# Altium PCB Baseboard-v2.0.PcbDoc (part 7 of 7)
Units mil, origin at the board's own origin, x right, y up, seen from the top; angles counter-clockwise.
Board outline 4488.19 x 3937 mil, 4 copper layers (Top Layer, Ground, Power + Signal, Bottom Layer), stack 61.81 mil thick; 219 components, 194 nets, 891 pads, 449 vias.
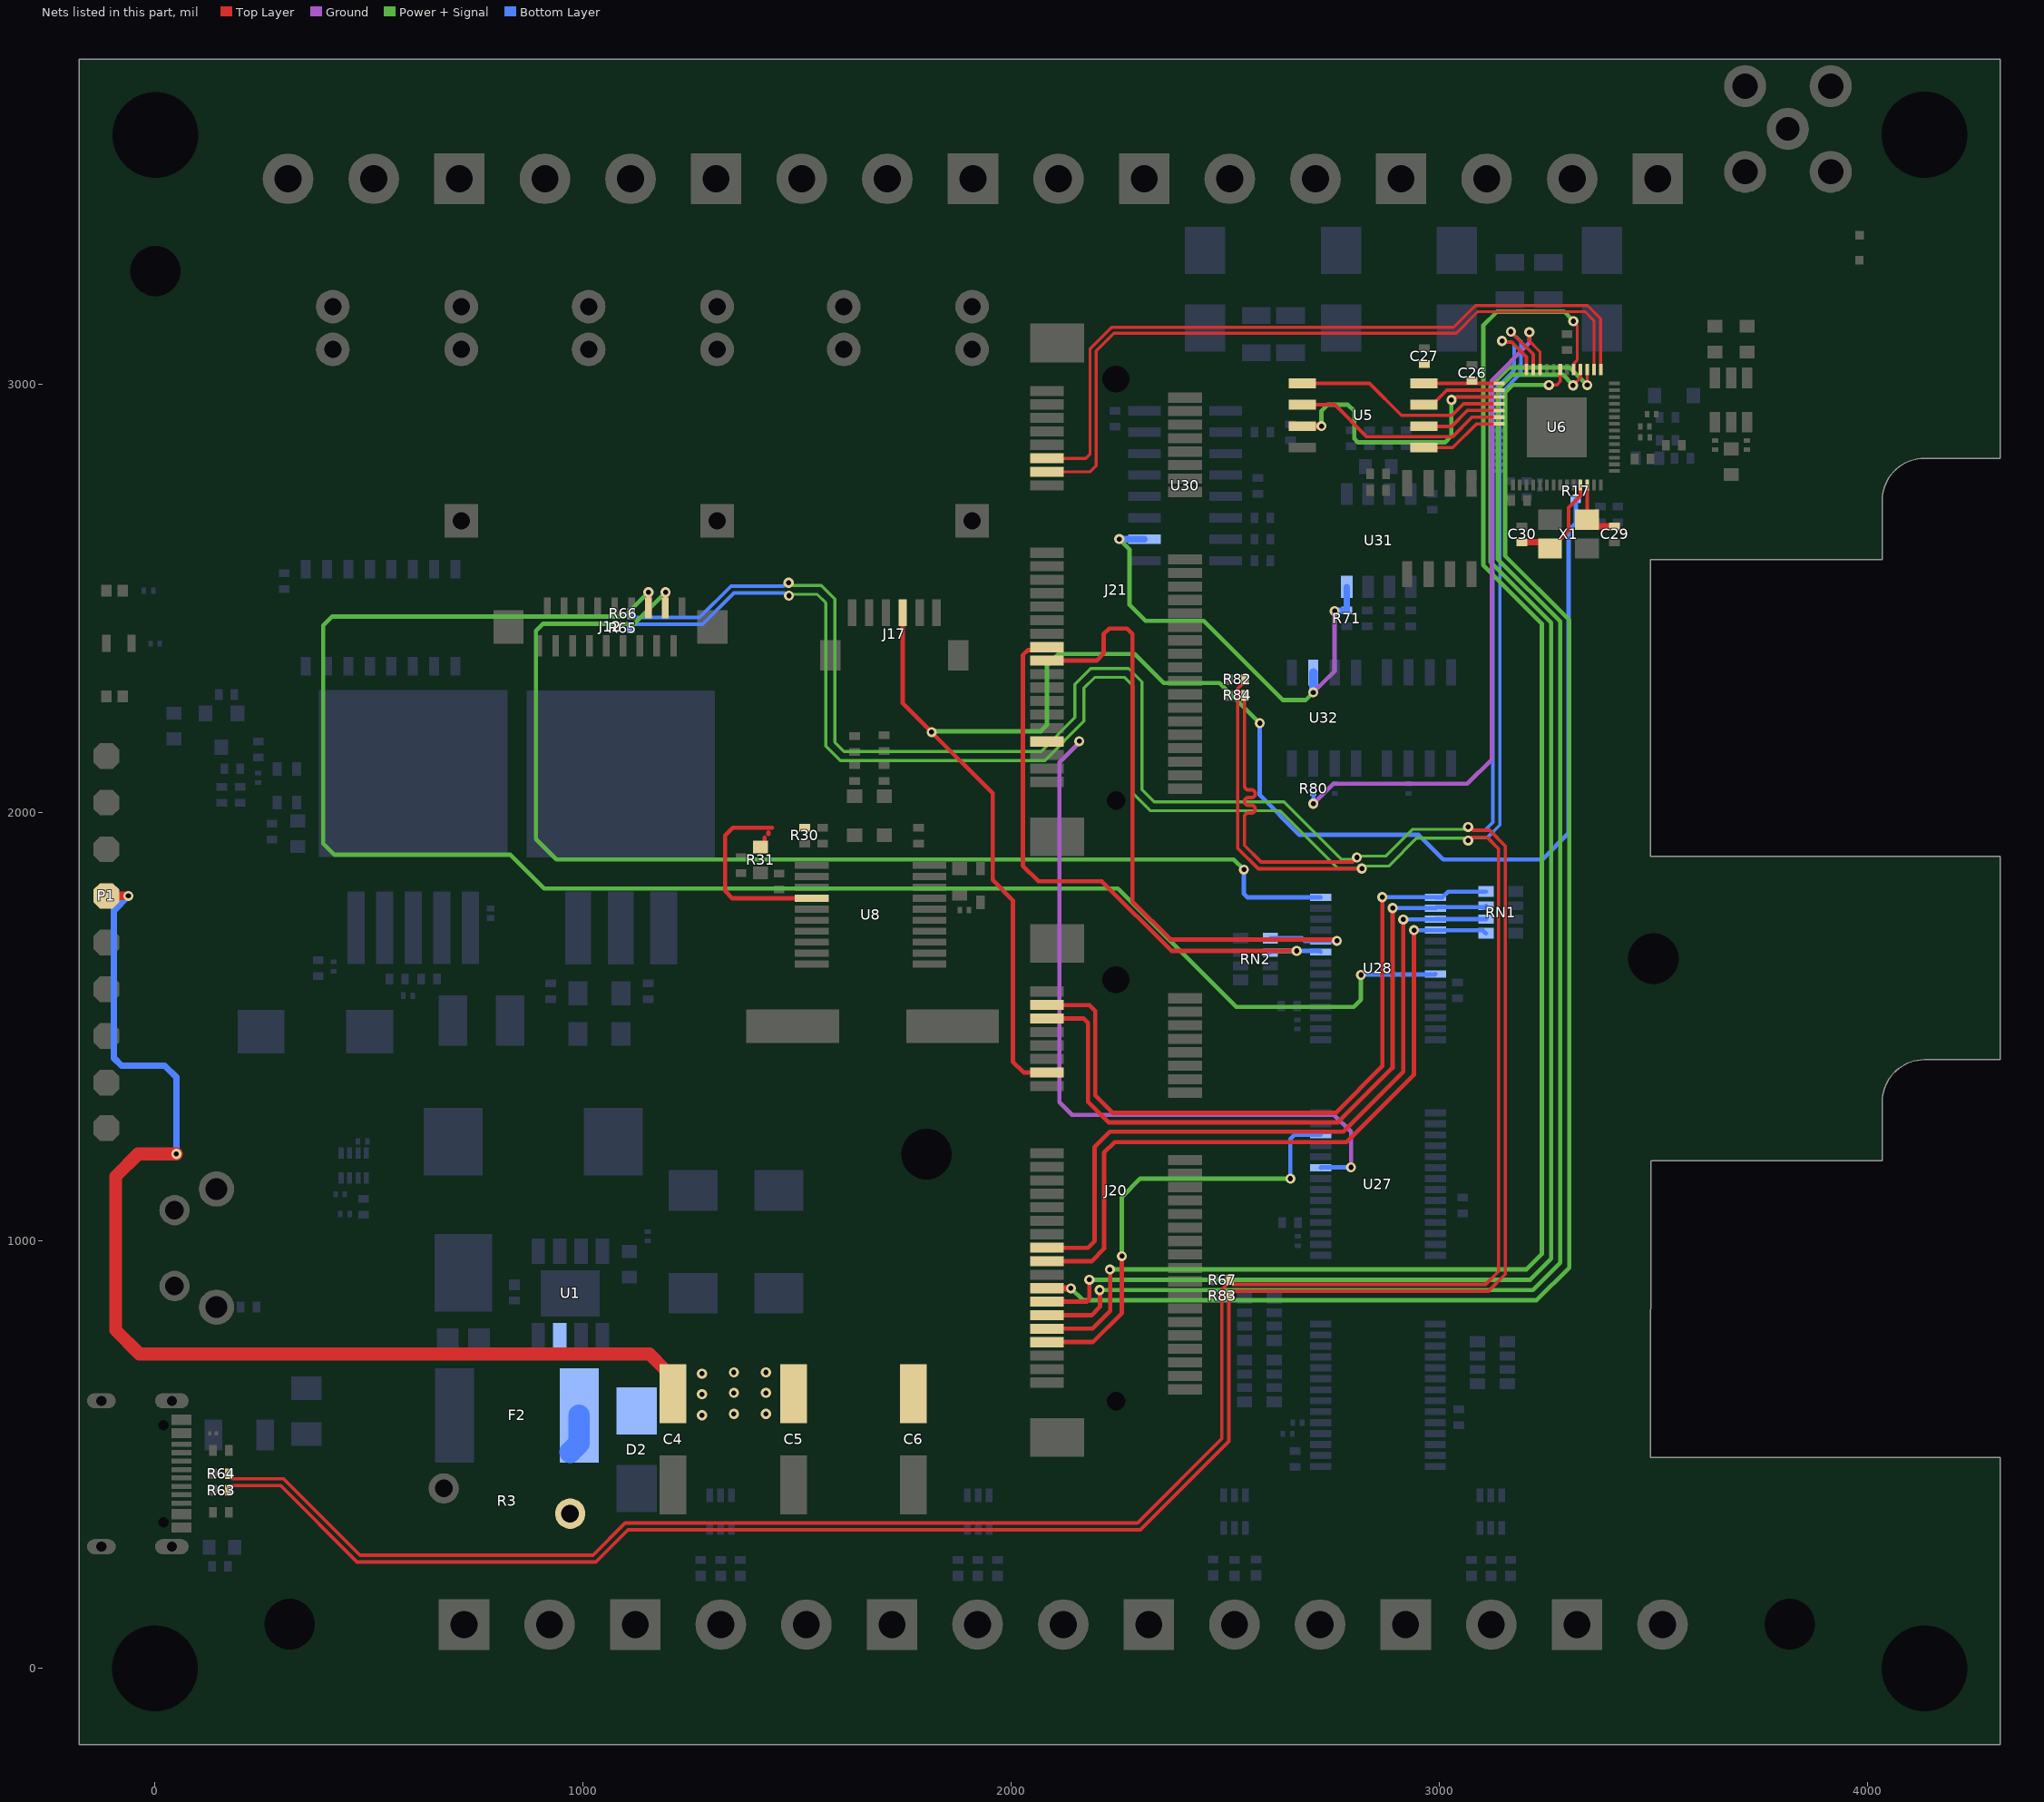
[diagram p6: the nets of this part, all layers, seen from the top]

## Via types
v1: diameter 23.62, hole 11.81, Top Layer to Bottom Layer, 449 vias

## Nets (pads, with @x,y where several pads share a name; then routed paths per layer and width w, separated by ;. In a path a pad name is that pad's centre, name@x,y a point inside that pad or via, vN(x,y) a via of type N, cw(c..) or ccw(c..) an arc to the next point about the centre after c; other vN are vias at no path point) (continued)
SLOTA_TYPE2: J21.31 RN2.2 U28.23 | length 1397.9
  Top Layer w10: J21.31@2083.72,2385.72 2076.91,2378.91 2039.59,2378.91 2027.74,2367.06 2027.74,1875.09 2063.83,1839 2211.96,1839 2374.8,1676.16 v1(2667.4,1676.16)
  Bottom Layer w10: RN2.2@2606.09,1672.57 2609.67,1676.16 2720.92,1676.16 U28.23@2723.67,1673.41
SLOTA_TYPE3: J21.33 RN2.1 U28.24 | length 1560.5
  Top Layer w10: J21.33@2083.72,2354.22 2199.78,2354.22 2216.2,2370.64 2216.2,2415.96 2229.27,2429.02 2270.9,2429.02 2283.76,2416.17 2283.76,1791.24 2372.35,1702.65 v1@2761.4,1702.65
  Bottom Layer w10: RN2.1@2606.09,1705.65 2679.67,1705.65 2686.32,1699 U28.24@2723.67,1699 2723.96,1699.29 2761.11,1699.29 v1(2761.4,1699.57)
SLOTA_UART_RX: J21.11 U6.15 | length 1717.3
  Top Layer w7: J21.11@2083.72,2826.66 2174.69,2826.66 2184.65,2836.61 2184.65,3083.11 2234.45,3132.91 2276.09,3132.91 3034.27,3132.91 3084.67,3183.31 3347.13,3183.31 3377.59,3152.85 U6.15@3377.59,3034.13
SLOTA_UART_TX: J21.13 U6.16 | length 1713
  Top Layer w7: J21.13@2083.72,2795.17 2184.06,2795.17 2198.65,2809.75 2198.65,3077.31 2240.25,3118.91 3040.07,3118.91 3090.47,3169.31 3341.33,3169.31 3361.84,3148.8 U6.16@3361.84,3034.13
SLOTB_CS: J20.37 U6.21 | length 3539
  Top Layer w7: v1(3256.57,2997.73) 3257.1,2998.25 3275.13,2998.25 3283.1,3006.21 U6.21@3283.1,3034.13
  Top Layer w10: J20.37@2083.84,888.11 J20.37@2083.72,888.23 J20.37@2084.11,888.61 ; v1@2139.25,888.61 v1@2139.63,889 ; v1@2139.89,888.11 v1(2140,888)
  Top Layer w15: J20.37@2083.84,888.11 v1@2139.89,888.11
  Power + Signal w10: v1(2140,888) 2167.81,860.19 3228.19,860.19 3304,936 3304,2448.84 3154.28,2598.56 3154.28,2980.48 3172.05,2998.25 3256.31,2998.25 v1@3256.84,2997.73
SLOTB_MISO: J20.41 U6.18 | length 3619.2
  Top Layer w7: v1(3312.91,2997.19) 3329.7,3013.99 3329.7,3033.48 U6.18@3330.34,3034.13
  Top Layer w10: J20.41@2083.72,825.24 2083.84,825.12 2188.05,825.12 2207.8,844.87 2207.8,883.2 v1(2207,884)
  Power + Signal w10: v1(2207,884) 3219,884 3283,948 3283,2445.8 3137.28,2591.52 3137.28,2987.52 3171.82,3022.06 3289.1,3022.06 3312.91,2998.26 v1(3312.91,2997.19)
SLOTB_MOSI: J20.43 U6.19 | length 3864.7
  Top Layer w7: v1(3313.84,3147) 3313.84,3143.67 3322.93,3134.59 3322.93,3056.94 3315.43,3049.43 3315.43,3034.96 U6.19@3314.6,3034.13
  Top Layer w10: J20.43@2083.72,793.74 2190.29,793.74 2231.61,835.06 2231.61,930.39 v1@2231,931
  Power + Signal w10: v1(2231,932) 3204,932 3240,968 3240,2440.71 3103.28,2577.43 3103.28,3137.28 3135.31,3169.31 3292.46,3169.31 3313.84,3147.93 v1(3313.84,3147)
SLOTB_SCLK: J20.39 U6.17 | length 3642.3
  Top Layer w7: v1@3346.07,3001.61 U6.17@3346.09,3034.13
  Top Layer w10: J20.39@2083.72,856.73 2177.14,856.73 2183,862.59 v1@2183,907.31 ; J20.39@2119.82,856.37 J20.39@2119.82,862.82
  Power + Signal w10: v1(2183,908) 3213,908 3262,957 3262,2442.76 3120.28,2584.48 3120.28,2994.56 3164.78,3039.06 3289.4,3039.06 3304.72,3039.06 v1(3346.05,2997.73)
SLOTB_TYPE0: J20.3 RN1.4 U28.1 | length 1691.8
  Top Layer w10: J20.3@2083.72,1549.65 2183.33,1549.65 2196.97,1536.01 2196.97,1338.44 2237.83,1297.57 2758,1297.57 2867.59,1407.16 2867.59,1801.39 v1(2867.4,1801.57)
  Bottom Layer w10: v1(2867.4,1801.57) 2867.51,1801.47 2991.28,1801.47 U28.1@2991.39,1801.36 3007.72,1801.36 3021.01,1814.65 RN1.4@3109.72,1814.65
SLOTB_TYPE1: J20.5 RN1.3 U28.2 | length 1675.6
  Top Layer w10: J20.5@2083.72,1518.15 2170.19,1518.15 2179.97,1508.37 2179.97,1323.39 2227.78,1275.57 2764.17,1275.57 2891.4,1402.81 2891.4,1776.17 v1(2891.61,1776.37)
  Bottom Layer w10: v1(2891.61,1776.37) 2891.9,1776.07 2991.09,1776.07 U28.2@2991.39,1775.77 2994.29,1778.67 3101.38,1778.67 3103.48,1776.57 3113.77,1776.57 RN1.3@3114.21,1776.14 ; RN1.3@3104.28,1776.14 RN1.3@3109.72,1781.57
SLOTB_TYPE2: J20.31 RN1.2 U28.3 | length 1681
  Top Layer w10: J20.31@2083.72,982.72 2179.54,982.72 2195.4,998.57 2195.4,1218.4 2230.57,1253.57 2776.17,1253.57 2916.4,1393.81 v1(2916.4,1749.57)
  Bottom Layer w10: v1@2916.4,1749.88 2991.08,1749.88 U28.3@2991.39,1750.18 2991.44,1750.13 3109.66,1750.13 RN1.2@3109.72,1750.08
SLOTB_TYPE3: J20.33 RN1.1 U28.4 | length 1678.4
  Top Layer w10: J20.33@2083.72,951.22 2188.05,951.22 2217.4,980.57 2217.4,1204.57 2242.03,1229.2 2783.57,1229.2 2941.4,1387.03 v1(2941.4,1724.57)
  Bottom Layer w10: v1(2941.4,1724.57) 2991.38,1724.58 3102.13,1724.59 RN1.1@3109.72,1717.01
SPICLK: U5.6 U6.33 | length 190.8
  Top Layer w8: U5.6@2965.03,2901.38 3028.98,2901.38 3066.26,2938.65 U6.33@3140.38,2938.65
SPICS0: U5.1 U6.32 | length 506.1
  Top Layer w8: U5.1@2676.41,3001.84 2837.42,3001.84 2912.02,2927.24 3029.98,2927.24 3057.15,2954.4 U6.32@3140.38,2954.4
SPID: U5.5 U6.35 | length 199.6
  Top Layer w8: U5.5@2963.67,2851.85 3031.9,2851.85 3087.21,2907.16 U6.35@3140.38,2907.16
SPIHD: U5.7 U6.30 | length 195.2
  Top Layer w8: U5.7@2959.77,2951.84 2984.92,2951.84 2992.34,2959.25 2992.34,2960.1 3018.13,2985.9 U6.30@3140.38,2985.9
SPIQ: U5.2 U6.34 | length 515.9
  Top Layer w8: U5.2@2674.47,2951.84 2756.61,2951.84 2831.35,2877.1 3031.12,2877.1 3076.93,2922.91 U6.34@3140.38,2922.91
SPIWP: U5.3 U6.31 | length 668.4
  Top Layer w5: U5.3@2680.78,2901.84 U5.3@2681.1,2902.15
  Top Layer w8: v1(3028.98,2963.09) 3033.21,2963.09 3040.27,2970.15 U6.31@3140.38,2970.15
  Top Layer w15: U5.3@2681.1,2902.15 v1(2725.3,2902.15)
  Power + Signal w10: v1(2725.3,2902.15) 2725.3,2937.45 2739.68,2951.84 2787.33,2951.84 2801.71,2937.45 2801.71,2872.73 2810.39,2864.06 3013.97,2864.06 3028.98,2879.07 v1(3028.98,2963.09)
TFT_CS: J12.14 U28.8 | length 4163.2
  Top Layer w10: J12.14@1152.79,2477.39 J12.14@1152.9,2477.49 ; v1@1152.9,2517.35 v1@1153,2517.45
  Top Layer w15: J12.14@1152.9,2477.49 v1@1152.9,2517.35
  Power + Signal w10: v1(1153,2513.75) 1096.63,2457.37 414.37,2457.37 393,2436 393,1927.22 419.65,1900.57 830.38,1900.57 909.4,1821.56 2249.89,1821.56 2525.99,1545.46 2800.46,1545.46 2817.4,1562.4 v1(2817.4,1620.01)
  Bottom Layer w10: v1(2817.4,1620.01) 2818.51,1621.12 2990.27,1621.12 U28.8@2991.39,1622.23
TFT_RESET: J12.16 U28.28 | length 2787.1
  Top Layer w10: J12.16@1192.16,2477.39 J12.16@1192.58,2477.8 ; v1@1192.58,2513.33 v1(1193,2513.75)
  Top Layer w15: J12.16@1192.58,2477.8 v1@1192.58,2513.33
  Power + Signal w10: v1(1193,2513.75) 1119.29,2440.03 905.92,2440.03 890,2424.11 890,1937.12 937.57,1889.56 2520.44,1889.56 v1(2544,1866)
  Bottom Layer w10: v1(2544,1866) 2544,1809 2551.64,1801.36 U28.28@2723.67,1801.36
TXD/RS485/RS232: R80.2 U6.24 | length 1615.7
  Top Layer w7: v1(3211,3121.38) 3211,3100.91 3235.86,3076.05 U6.24@3235.86,3034.13
  Ground w10: v1(2706.27,2020) 2752.75,2066.48 3066.04,2066.48 3122.86,2123.3 3122.86,3008.07 3211,3096.21 v1(3211,3121.38)
  Bottom Layer w10: v1(2706.27,2020) R80.2@2706.27,2044.17
TXD/RS485/RS232/T: R71.1 U30.10 U31.4 U32.6 | length 1091.1
  Ground w10: v1(2706,2280) 2756,2330 v1(2756,2470.19)
  Power + Signal w10: v1(2252.92,2638) 2277,2613.92 2277,2484 2314,2447 2450.17,2447 2635.17,2262 2688,2262 v1(2706,2280)
  Bottom Layer w10: U30.10@2311.38,2637.86 U30.10@2311.52,2637.72 ; U32.6@2706.13,2326.4 U32.6@2706.27,2326.26
  Bottom Layer w15: v1@2254.14,2637.86 U30.10@2311.38,2637.86 ; v1(2756,2470.19) 2756.53,2470.72 2783.61,2470.72 R71.1@2784.14,2471.25 U31.4@2784.14,2526.48
  Bottom Layer w20: v1@2706.13,2280 U32.6@2706.13,2326.4
TXD/SLOTB_UART_TX: J17.3 J20.13 R17.2 | length 4001
  Top Layer w10: J17.3@1747.09,2466.15 1747.09,2254.47 v1(1814.49,2187.07) ; v1@1814.65,2186.91 1957.1,2044.46 1957.1,1841.79 2004.37,1794.51 2004.37,1417.4 2029.6,1392.17 J20.13@2083.72,1392.17
  Power + Signal w10: v1(1814.49,2187.07) 1816.64,2189.22 2070.08,2189.22 2083.92,2203.06 2083.92,2342.64 2111.25,2369.97 2289.07,2369.97 2357.04,2302 2487.14,2302 v1(2581.07,2208.07)
  Bottom Layer w10: v1(2581.07,2208.07) 2581,2208 2581,2039.95 2673.75,1947.2 2952.34,1947.2 3009.95,1889.59 3241.39,1889.59 3302.5,1950.7 3302.5,2658.35 3319.52,2675.37 R17.2@3319.52,2731.33
USB.USB_N: R64.2 R65.2 R67.2 R82.2 U6.25 | length 9531.6
  Top Layer w8: R64.2@172.92,454.69 172.92,451.19 180.85,443.26 300.36,443.26 478.79,264.84 1023.55,264.84 1098.7,340 2295.59,340 2492.64,537.06 2492.64,885.08 R67.2@2511.64,904.08 ; R67.2@2511.64,907.58 R67.2@2511.64,904.08 ; R82.2@2546.5,2310 2541.5,2305 2541.5,2300.81 2529.5,2288.81 2529.5,1915.78 2577.48,1867.8 2818.78,1867.8 v1(2819.59,1868.61) ; v1(3068,1934) 3075.81,1941.81 3111.56,1941.81 3139,1914.37 3139,927.55 3108.53,897.08 2518.64,897.08 R67.2@2511.64,904.08 ; v1(3167.7,3122.7) 3220.11,3070.3 U6.25@3220.11,3034.13
  Power + Signal w7: v1(1481.25,2505.83) 1484.43,2509.01 1547.73,2509.01 1567.59,2489.15 1567.59,2154.71 1601.35,2120.95 2078.92,2120.95 2170.4,2212.43 2170.4,2290.2 2195.21,2315 2266,2315 2285.15,2295.85 2285.15,2044.02 2325.67,2003.5 2628.77,2003.5 2763.66,1868.61 v1(2819.59,1868.61) ; v1@2819.59,1868.42 2823.9,1868.42 2829.72,1874.24 2882.35,1874.24 2884.25,1876.14 2947.41,1939.31 v1@3058.19,1939.31
  Bottom Layer w8: R65.2@1111.5,2430 1111.5,2433.5 1116.5,2438.5 1120.78,2438.5 1121.19,2438.9 1279.02,2438.9 1352.4,2512.28 1470.57,2512.28 1477.02,2505.83 v1(1481.25,2505.83) ; v1(3068,1934) 3072.23,1934 3080.04,1941.81 3113.69,1941.81 3141.89,1970.01 3141.89,2976.63 3191.28,3026.02 3191.28,3099.12 v1(3167.7,3122.7)
USB.USB_P: R63.2 R66.2 R83.2 R84.2 U6.26 | length 9516.1
  Top Layer w8: R63.2@172.92,415.83 172.92,419.33 180.85,427.26 293.74,427.26 472.16,248.84 1030.17,248.84 1105.33,324 2302.21,324 2508.64,530.43 2508.64,867.58 R83.2@2511.64,870.58 ; R83.2@2509.89,872.33 2518.64,881.08 3115.16,881.08 3155,920.92 3155,1921 3118.19,1957.81 3080.04,1957.81 3072.23,1965.62 v1@3068.64,1965.62 ; R84.2@2546.5,2273 2545.5,2272 2545.5,2097.2 2545.5,2061.43 ccw(c2554.5,2061.43) 2554.5,2052.43 2561.82,2052.43 cw(c2561.82,2043.43) 2561.82,2034.43 2554.5,2034.43 ccw(c2554.5,2025.43) 2554.5,2016.43 2561.82,2016.43 cw(c2561.82,2007.43) 2561.82,1998.43 2554.5,1998.43 ccw(c2554.5,1989.43) 2545.5,1989.43 2545.5,1967.43 2545.5,1922.41 2584.11,1883.8 2798.5,1883.8 v1@2808,1893.3 ; v1(3147,3101) 3149.99,3098.01 3169.77,3098.01 3204.36,3063.42 3204.36,3034.38 U6.26@3204.11,3034.13
  Power + Signal w7: v1(1480.4,2536) 1484.9,2536 1490.89,2530.01 1556.43,2530.01 1588.59,2497.85 1588.59,2163.41 1610.05,2141.95 2070.23,2141.95 2149.4,2221.13 2149.4,2298.89 2186.51,2336 2274.7,2336 2306.15,2304.55 2306.15,2052.72 2334.37,2024.5 2637.47,2024.5 2772.36,1889.61 2798.61,1889.61 2806.92,1897.92 2807.45,1897.92 2807.69,1897.68 2876.08,1897.68 2938.72,1960.31 v1@3058.19,1960.31
  Bottom Layer w8: R66.2@1112.24,2463.81 1112.24,2460.31 1117.24,2455.31 1121.52,2455.31 1121.93,2454.9 1272.39,2454.9 1345.77,2528.28 1468.46,2528.28 1476.17,2536 v1(1480.4,2536) ; v1(3068,1965.62) 3072.23,1965.62 3080.04,1957.81 3107.06,1957.81 3125.89,1976.64 3125.89,2983.25 3175.28,3032.64 3175.28,3092.5 3168.89,3098.89 3153.34,3098.89 v1@3151,3101.23
  other v1: 2808,1894.5
VCC: C4.1 C5.1 C6.1 D2.2 F2.2 P1.1 R3.1 U1.7 | length 2746.7
  Top Layer w20: P1.1@-113.27,1804.51 v1(-62,1804.51)
  Top Layer w30: v1(50,1202) -39.12,1202 -91.62,1149.5 -91.62,790 -36.15,734.53 1155.27,734.53 C4.1@1189.33,700.47 ; C5.1@1477.55,658.52 C5.1@1494.5,641.58
  Bottom Layer w15: v1(-62,1804.51) -95.51,1771 -95.51,1425.51 -78.07,1408.07 22.93,1408.07 50,1381 v1(50,1202)
  Bottom Layer w50: F2.2@970.11,505.1 991.14,526.13 F2.2@991.14,591.09
  other v1: 1278.14,591.57 1352.4,594.57 1427.4,594.57 1278.14,640.57 1352.4,643.57 1427.4,643.57 1278.14,688.58 1352.4,691.57 1427.4,691.57
VDD_SPI: C26.2 C27.2 U5.8 U6.29 | length 175.8
  Top Layer w8: U5.8@2964.64,3001.84 2964.83,3001.65 U6.29@3140.38,3001.65
VREF: R30.1 R31.2 U8.4 | length 464.9
  Top Layer w10: 1424.41,1936.56 1424.41,1941.07 ; 1433.21,1952.56 1433.21,1949.13 1433.61,1948.73 ; 1441.6,1963.87 1417.96,1963.87 1350.1,1963.87 1331.82,1945.59 1331.82,1816.63 1349.51,1798.95 U8.4@1534.57,1798.95
W5500_INTA: J21.45 U27.23 | length 1727
  Ground w10: v1(2159.53,2166) 2159.53,2163.53 2112.81,2116.81 2112.81,1322.55 2142.36,1293 2754.62,1293 2794.23,1253.39 v1(2794.23,1170.61)
  Bottom Layer w10: U27.23@2723.68,1169.75 2724.6,1170.68 2793.3,1170.68 v1@2794.23,1171.61
W5500_INTB: J20.45 U27.26 | length 1053.5
  Top Layer w10: J20.45@2083.72,762.24 2084.1,762.62 2191.63,762.62 2259,829.99 v1(2259,963.03)
  Power + Signal w10: v1(2259,963.03) 2259,1101 2302.16,1144.16 v1(2652.7,1144.16)
  Bottom Layer w10: v1(2652.7,1144.16) 2652.7,1236.76 2662.46,1246.52 U27.26@2723.68,1246.52
XTAL_IN: C29.2 U6.54 X1.1 | length 155.8
  Top Layer w8: X1.1@3336.09,2692.69 X1.1@3345.56,2683.22 X1.1@3360.06,2668.72 ; X1.1@3346.09,2692.69 U6.54@3346.09,2764.44
  Top Layer w15: X1.1@3360.06,2668.72 3361.06,2667.72 C29.2@3409.79,2667.72
XTAL_OUT: C30.2 U6.53 X1.3 | length 253.7
  Top Layer w8: X1.3@3244.52,2630.72 cw(c3244.52,2616.29) X1.3@3258.95,2616.29 3262.88,2616.29 3302.5,2655.91 3302.5,2711.31 3330.34,2739.15 U6.53@3330.34,2764.44
  Top Layer w15: C30.2@3193.56,2630.72 X1.3@3244.52,2630.72
pads on no net: J3.A8 J3.B8 J3.MH J12.18 J20.12 J20.14 J20.16 J20.20 J20.22 J20.MH J21.12 J21.14 J21.16 J21.20 J21.22 J21.MH U1.2 U1.3 U1.5 U6.8 U6.28 U6.38 U6.39 U6.40 U6.41 U6.42 U6.51 U6.52 U7.1 U7.2 U7.3 U7.7 U8.7 U8.16 U11.7 U11.8 U11.11 U11.14 U11.27 U11.28 U20.4 U20.5 U20.6 U20.7 U20.10 U20.11 U20.12 U20.13 U27.8 U27.11 U27.14 U27.19 U27.20 U27.28 U28.11 U28.14 U28.19 U28.20 U30.11 U30.12 U30.13 U30.14 U33.3 U33.6

## Polygon pours and split planes (outlines as drawn)
GND on Top Layer "GND_L01_P002" (solid, remove dead copper, pour order 2): 4131.45,1460 ccw(c4131.45,1328.55) 4000,1328.55 4000,1240 3440,1240 3440,440 4260,440 4260,-130 -130.27,-130 -130.27,2580 180,2580 224,2536 1646.94,2536 2044,2933.05 2044,3720 4260,3720 4260,2640 3440,2640 3440,1850 4260,1850 4260,1460
GND on Ground "GND_L02_P005" (solid, remove dead copper, pour order 5): 4131.45,1460 ccw(c4131.45,1328.55) 4000,1328.55 4000,1240 3440,1240 3440,440 4260,440 4260,-130 -130.27,-130 -130.27,2580 180,2580 262.51,2497.49 1977.49,2497.49 2044,2564 2044,3720 4260,3720 4260,2640 3440,2640 3440,1850 4260,1850 4260,1460
GND on Power + Signal "GND_L03_P006" (solid, remove dead copper, pour order 6): 4131.45,1460 ccw(c4131.45,1328.55) 4000,1328.55 4000,1240 3440,1240 3440,440 4260,440 4260,-130 -130.27,-130 -130.27,2580 180,2580 262.51,2497.49 1977.49,2497.49 2044,2564 2044,3720 4260,3720 4260,2640 3440,2640 3440,1850 4260,1850 4260,1460
GND on Bottom Layer "GND_L04_P007" (solid, remove dead copper, pour order 7): 4131.45,1460 ccw(c4131.45,1328.55) 4000,1328.55 4000,1240 3440,1240 3440,440 4260,440 4260,-130 -130.27,-130 -130.27,2580 180,2580 262.51,2497.49 1977.49,2497.49 2044,2564 2044,3720 4260,3720 4260,2640 3440,2640 3440,1850 4260,1850 4260,1460

## Keep-outs
Keep-Out Layer:
  circle w5: c0.75,3264.01 r118.11
  circle w5: c314.97,103.41 r118.11
  circle w5: c0,0 r137.8
  circle w5: c1802.4,1203.57 r118.11
  circle w5: c3501,1658 r118.11
  circle w5: c3819,103.41 r118.11
  circle w5: c4133.98,0 r137.8
  circle w5: c4133.98,3582.67 r137.8
  circle w5: c0.75,3582.03 r137.8

## Other copper
Top Layer:
  rectangle net NetD5_1: 1918.59,1764.47 1939.07,1805.38
  rectangle net NetD5_1: 1896.45,1764.47 1939.07,1779.04
  rectangle net NetR27_1: 1862.6,1764.47 1885.43,1808.38
  rectangle net NetR27_1: 1862.6,1793.38 1897.6,1831.66
  rectangle net NetR27_1: 1770.08,1817.53 1897.6,1831.66
  rectangle net NetD5_2: 1862.6,1841.86 1939.07,1884.12
  rectangle net NetD5_2: 1770.08,1843.12 1939.07,1857.25
  rectangle net NetD6_2: 1622.3,2021.43 1647.3,2081.84
  rectangle net NetD7_2: 1690.8,2021.43 1715.8,2081.84
  rectangle net NO_3: 1452.1,3419.84 1575.27,3546
  rectangle net NO_3: 1452.1,3034 1541.86,3546
  rectangle net NO_3: 1452.1,3034 1648.58,3120.46
  rectangle net NO_1: 252.1,3419.84 375.27,3546
  rectangle net NO_1: 252.1,3034 341.86,3546
  rectangle net NO_1: 252.1,3034 457.81,3120.46
  rectangle net NO_2: 852.1,3034 1057.81,3120.46
  rectangle net NO_2: 852.1,3034 941.86,3546
  rectangle net NO_2: 852.1,3419.84 975.27,3546
  rectangle net NC_3: 1571.76,3143.49 1653.55,3382
  rectangle net NC_3: 1575.27,3290.64 1968.95,3382
  rectangle net NC_3: 1852.03,3290.64 1970.14,3538.63
  rectangle net NC_2: 975.27,3143.49 1057.81,3382
  rectangle net NC_2: 975.27,3290.64 1368.95,3382
  rectangle net NC_2: 1252.03,3290.64 1370.14,3538.63
  rectangle net NC_1: 652.03,3290.64 770.14,3538.63
  rectangle net NC_1: 375.27,3290.64 768.95,3382
  rectangle net NC_1: 375.27,3143.49 457.81,3382
  rectangle net GND: 1776.61,2386 1796.3,2497.65
  rectangle net 3V3: 1816.16,2386 1835.84,2497.65
  rectangle net GND: 3484.67,2811.95 3514.76,2829.9
  rectangle net 3V3: 3486.42,2868.38 3506.78,2906.21
  rectangle net EN: 3465.16,2851.9 3475.79,2882.95
  rectangle net OLED/ENC_SDA: 3063.8,2738.24 3087.21,2810.83
  rectangle net OLED/ENC_SCL: 3013.8,2738.24 3037.43,2812.67
  rectangle net 3V3: 3286.35,3062.35 3308.48,3073.78
  rectangle net GND: 2375.89,1022.15 2434.19,1070.46
  rectangle net GND: 2053,1014.21 2114.26,1203
  rectangle net GND: 3629.96,3423.66 3787.47,3497.08
  rectangle net GND: 3880,2640 3950,2990.57
  rectangle net GND: 3672.72,3014.59 3691,3178.15
  rectangle net GND: 3558,2825.43 3615.09,3400.52
  rectangle net GND: 1495.2,1741.85 1573.94,1779.41
  rectangle net GND: 2381.16,777.99 2435.17,839.13
  rectangle net GND: 2058.5,667.76 2112.48,730.75
  rectangle net GND: 2384.37,2430 2426,2464.46
  rectangle net GND: 2056.04,2416 2111,2606.19
  rectangle net GND: 2059.67,2065.76 2111.35,2133.75
  rectangle net GND: 2379.31,2180.99 2431,2243.98
  rectangle net 5V: 345,964 1962,1044
  rectangle net NetC23_2: 3398.27,2812.67 3465.67,2828.42
  rectangle net GSM_PWR: 2367.19,1556.58 2445.93,1602.52
  region net GND: 2389,818.54 2362,818.54 2362,799.94 2389,799.94
  region net GND: 1831,524 1660,524 1660,359.37 1831,359.37
  rectangle net GND: 1427.4,359.37 1623.14,513
  rectangle net GND: 1150,359.37 1324.5,513
  rectangle net VCC: 1190.53,572.68 1803.64,710.47
  rectangle net GSM_PWR: 2217.4,1353 2327,1556.39
  rectangle net GSM_PWR: 2299,1356.73 2327,1602.52
  rectangle net GSM_PWR: 2298.5,1556.39 2445.93,1602.52
  rectangle net ANT: 3397.27,2775.84 3699.97,2796.92
  rectangle net 3V3: 3361.84,2751.65 3381.92,2777.24
  rectangle net 3V3: 3486.42,2894.07 3519.54,2908.07
  rectangle net 3V3: 3502.26,2885.03 3523.76,2937.54
  rectangle net GND: 1266.97,2393.73 1365.21,2472.46
  rectangle net 3V3: 2867.32,2738.24 2937.43,2803.06
  rectangle net GSM/W5500_PWR_ENA: 2100,2974.95 2140,2993.55
  rectangle net 5V_BUCK: 502.64,1061.68 1097,1144.58
  rectangle net 5V: 559.33,1269 675.33,1545
  rectangle net 5V: 332.18,964 480.22,1346.08
  rectangle net 5V: 453.32,1242 675.33,1346.4
  rectangle net 5V: 1846,684 1962,1042
  region net GND: 2093.89,677 2093.89,637 2112.48,637 2112.48,677
  region net GND: 2056.95,677 2056.95,637 2075.55,637 2075.55,677
  rectangle net 5V: 2231.61,705.46 2381.16,755.15
  rectangle net GND: 2830.32,2739.06 2848.32,2803.06
  rectangle net NetC46_1: 3669.9,2842.84 3694.31,2935.46
  rectangle net NetR85_2: 3712.23,2863.35 3726.79,2911.44
  rectangle net NetR86_2: 3637.42,2863.35 3651.99,2911.44
  rectangle net GSM_PWR: 2367.19,2959.72 2445.93,3011.7
  rectangle net GND: 442.4,1931.57 762.4,2245.25
  rectangle net W5500_INTA: 2100,2155.95 2170.89,2174.55
  region net 5V: 2480.64,2127.05 2431,2127.05 2431,2108.46 2480.64,2108.46
  region net 5V: 2480.64,2158.15 2431,2158.15 2431,2139.56 2480.64,2139.56
  region net 5V: 2389,724.05 2349,724.05 2349,705.46 2389,705.46
  region net 5V: 2389,755.15 2349,755.15 2349,736.56 2389,736.56
  region net 3V3: 2389.37,2505.38 2349,2505.38 2349,2486.78 2389.37,2486.78
  region net 3V3: 2389.37,2064.43 2349,2064.43 2349,2045.84 2389.37,2045.84
  region net 3V3: 2389.37,661.43 2362,661.43 2362,642.84 2389.37,642.84
  rectangle net GND: 2100,1446.11 2140,1464.7
  rectangle net GND: 2148.34,530.76 2188.34,549.35
  region net GND: 2389,1196.49 2362,1196.49 2362,1177.9 2389,1177.9
  region net GND: 2389,1056.05 2362,1056.05 2362,1037.45 2389,1037.45
  rectangle net VDD_SPI: 2932.95,2990.42 2996.34,3055.48
  rectangle net NetD6_1: 1617.08,1928.13 1721.52,1962.37
  rectangle net NetC34_1: 1690.81,2100.84 1715.75,2151.73
  rectangle net NetC33_1: 1622.3,2099.52 1647.3,2149.73
  rectangle net NetR26_2: 1495.27,1869.69 1572.3,1935.9
  rectangle net VREF: 1396.91,1903.56 1439.01,1972.9
  rectangle net VREF: 1396.91,1954.23 1530.3,1972.9
  rectangle net 5V: 2367.19,2109.19 2497.1,2159.15
  rectangle net 5V: 2367.19,705.46 2445.93,756
  rectangle net 3V3: 927.28,1931.96 1247.28,2245.64
  region net GND: 3670.72,3163.55 3670.72,3329.35 cw(c3695.18,3322.65) 3697.73,3347.88 3775.6,3347.88 ccw(c3781.9,3406.32) 3840.56,3402.64 3840.56,3496.09 3950,3496.09 3950,3316.72 3761.05,3316.72 ccw(c3761.05,3249.49) 3693.81,3249.48 3693.81,3163.55
  region net GND: 3660.78,3452.43 ccw(c3715.57,3507.22) 3715.57,3429.73 3726.44,3429.73 cw(c3670.02,3486.15) 3670.02,3406.37 3612.54,3406.37 3612.54,3366.61 3590.14,3389.01 3590.14,3452.43
  region net GND: 3612.54,3336.49 cw(c3677.99,3336.49) 3630,3381 cw(c3686.14,3324.9) 3686.16,3404.26 3761.99,3404.26 ccw(c3761.99,3431.89) 3781.52,3412.35 ccw(c3763.95,3427.16) 3786.84,3429.12 3787.47,3496.09 ccw(c3782.57,3484.41) 3777.67,3496.09 3774.38,3475.99 cw(c3722.61,3484.6) 3753.1,3441.88 cw(c3715.53,3489) 3708.76,3429.12 3612.54,3429.12
  region net GND: 3950,3259.51 3767.56,3259.51 ccw(c3767.56,3245.11) 3753.16,3245.11 3753.16,2977.02 cw(c3750.71,2977.02) 3750.71,2974.57 3950,2974.57
  region net GSM_PWR: 2304,1602.52 2304,1537.83 2217.4,1537.83 2217.4,1561.46 2250.14,1561.46 ccw(c2251.04,1603.42) 2293,1602.52
  pour cut-out: 3950,2590.58 3950,3759.14 4311.08,3759.14 4311.08,2590.58
Ground:
  rectangle net GND: 3184.2,2837.26 3335.7,2963.46
  rectangle net GND: 3195.54,2955.15 3229.76,2983.06
  rectangle net GND: 3590.14,3387.2 3950,3506.09
  rectangle net GND: 3880,2640 3950,2990.57
  rectangle net GND: 3558,2875.22 3949,3400.52
  pour cut-out: 3950,2590.58 3950,3759.14 4311.08,3759.14 4311.08,2590.58
Power + Signal:
  rectangle net GND: 3184.2,2837.26 3335.7,2963.46
  rectangle net GND: 3562.53,3114.26 3609.18,3254.06
  rectangle net GND: 3590.14,3387.2 3950,3496.09
  rectangle net GND: 3880,2640 3950,2990.57
  rectangle net GND: 3563.08,2859.39 3949,3400.52
  region net GND: 3556.91,3387.29 3556.91,3251.09 3622.35,3185.65 3624.92,3185.65 3624.92,3400.52 3570.14,3400.52
  region net GND: 3586.5,2978.08 3547,2978.08 3547,3099.47 3586.5,3138.97 3586.5,3139.28
  pour cut-out: 3950,2590.58 3950,3759.14 4311.08,3759.14 4311.08,2590.58
Bottom Layer:
  rectangle net GND: 228.5,831.48 275.71,856.48
  rectangle net EN: 175.51,831.48 209.5,856.48
  rectangle net 3V3: 3136.37,434 3188,625.37
  rectangle net 3V3: 2912,379 3063.64,453.56
  rectangle net 3V3: 2912,434 3188,453.56
  rectangle net 3V3: 2984.21,2731.83 3088.28,2754
  rectangle net 5V_USB: 425.04,1227.52 454.63,1242.06
  rectangle net 5V_USB: 379,1227.52 444.26,1260.18
  rectangle net 5V_BUCK: 430.04,1168.09 455.63,1182.09
  rectangle net 5V_BUCK: 416.29,1168.09 438.94,1217.42
  rectangle net 5V_BUCK: 509.46,1068.59 575,1135.29
  rectangle net VCC: 929.4,326.14 1036.4,719
  rectangle net DTMF*_-: 186.9,2050.07 209.9,2136.57
  rectangle net DTMF*_+: 139.4,2049.57 171.54,2161.59
  rectangle net GND: 3367.22,2656.51 3459.64,2685.85
  rectangle net GND: 3367.22,2590.58 3422.55,2685.85
  rectangle net ADJ: 368.4,1651 477.85,1670.57
  rectangle net 3V3: 2966.47,591.51 3188,608.05
  rectangle net GND: 3546.76,2871.45 3630.29,2922.22
  rectangle net GND: 3551.76,2922.22 3574.88,2955.12
  rectangle net GND: 3196.76,2951.85 3227.68,2980.17
  rectangle net GND: 3590.14,3387.2 3950,3506.09
  rectangle net GND: 3880,2640 3950,2990.57
  rectangle net NetD40_2: 3221.64,3174 3427.4,3214
  rectangle net GND: 3558,2895.61 3949,3400.52
  rectangle net GND: 492,1148 516.28,1158.96
  rectangle net GND: 2708,986.35 2737.77,1020
  rectangle net EN: 10.43,802.65 189,928.83
  rectangle net PR1: 417.12,1138 432.04,1153.96
  rectangle net PR1: 414.12,1053.81 422.29,1153.96
  rectangle net 5V: 454.63,1252.38 474.31,1281.17
  rectangle net 5V_BUCK: 438.63,1077.74 549,1123
  rectangle net PR1: 414.12,1053.81 433.12,1068.38
  region net 5V: 1010.68,1623 650.42,1623 650.42,1591.07 1010.68,1591.07
  rectangle net 3V3: 3364.46,2704.85 3430.05,2748.38
  rectangle net 3V3: 2867.32,2633.13 2947.92,2683.5
  rectangle net 3V3: 2920.36,2633.13 2947.92,2743.02
  rectangle net 3V3: 3009.77,2381 3048,2754
  rectangle net 3V3: 2794.46,2381 3034,2443.25
  rectangle net 3V3: 2794.46,2083.48 2890.08,2443.25
  rectangle net 3V3: 2292,2474 2362.19,2521
  rectangle net 3V3: 2305.71,1079.33 2362.19,1106.33
  rectangle net 3V3: 2305.71,1489.15 2362.19,1516.15
  rectangle net 3V3: 1088.94,1847.61 2310.71,1898
  rectangle net 3V3: 1088.44,1862.83 1308.44,1944.74
  region net 3V3: 2630.07,549.6 2527.61,549.6 2527.61,436 2630.07,436
  rectangle net 3V3: 2305.71,2041 2362.19,2068
  rectangle net GND: 3184.2,2829.38 3344.23,2969.28
  rectangle net NetC3_2: 627.5,821.96 788,1309.32
  rectangle net NetC3_2: 827.5,777.77 881.68,868.09
  rectangle net NetC3_2: 653.54,821.96 852.5,868.09
  rectangle net NetC3_2: 827.5,742.75 911.26,793.93
  rectangle net 5V: 668.42,1464.06 729.46,1623
  rectangle net 5V: 454.63,1252.38 527,1339.71
  rectangle net 5V_USB: 313,625 392,1260.18
  rectangle net GSM_PWR: 527.4,1563.57 580.61,1579.57
  rectangle net 5V: 1846,699 2266.79,758.31
  rectangle net 5V: 585.93,1454.45 729.46,1531.98
  rectangle net 5V: 2367.19,703.19 2504.93,758.31
  rectangle net 3V3: 3165.39,2727.33 3216.92,2745.33
  rectangle net 3V3: 2920.36,2731.83 2996.71,2768.61
  rectangle net NetD41_2: 2993.91,3174 3198.57,3214
  rectangle net 3V3: 3506.17,2811.59 3559.24,2839.48
  rectangle net 3V3: 3502.26,2811.59 3526.57,2990.87
  rectangle net GSM_PWR: 409.4,1355 2267,1406
  rectangle net GSM_PWR: 2384.15,1566 2435.8,3011.7
  rectangle net 5V: 2454.93,703.19 2505,2169.18
  rectangle net RST_B: 2663.08,1009.4 2677.65,1041.09
  rectangle net 3V3: 2663.08,956.76 2677.65,987.75
  rectangle net RST_A: 2657.04,498.65 2676.42,548.6
  rectangle net 3V3: 2601,388.54 2632.73,548.6
  rectangle net 3V3: 2601,379 2945.99,416
  rectangle net 3V3: 2310.71,637 2545.33,685
  region net 5V: 2473,724.49 2349,724.49 2349,705.9 2473,705.9
  region net 5V: 2473,755.59 2349,755.59 2349,737 2473,737
  rectangle net 3V3: 2287,637 2337,2521
  rectangle net RE/DE/RS485/T: 2820.36,2500.89 2897.92,2552.07
  rectangle net NetR72_1: 2867.32,2717.43 2897.92,2820.93
  rectangle net NetR75_1: 2820.36,2717.43 2849.64,2807.06
  rectangle net NetR72_1: 2867.32,2789.56 2935.07,2864.06
  rectangle net NetR75_1: 2782.14,2789.56 2849.64,2864.06
  rectangle net GND: 2230.42,2876.89 2349.91,2910
  rectangle net NetD43_2: 2643.62,3053.89 2818.33,3093.26
  rectangle net NetD42_2: 2405.84,3053.89 2582,3093.26
  rectangle net NetD1_1: 72.18,328.03 132.67,581.64
  rectangle net Shell_: 95,190 142.94,308.24
  rectangle net NetF1_2: 236.37,509.8 409.4,581.46
  rectangle net GSM_PWR: 409.4,1355 556.34,1617.07
  rectangle net GSM_PWR: 516.49,1449.57 556.59,1695.42
  rectangle net GSM_PWR: 527.4,1598.4 545.42,1696.57
  rectangle net 3V3: 1058.44,1548.8 1118.4,2013.57
  rectangle net 3V3: 1088.44,1591.07 1164.9,1609.07
  rectangle net GND: 575.4,1610.5 631.4,1968.57
  rectangle net GND: 602.27,1564.28 631.4,1610.5
  rectangle net 5V: 650.4,1454.45 690.4,1668.57
  rectangle net GND: 575.42,1598 631.42,1623
  rectangle net 5V: 958.44,1548.8 1018.4,1713.53
  rectangle net NetF2_1: 658.61,479.57 910.4,701.33
  rectangle net VCC: 929.68,628.57 961.4,803.6
  rectangle net VCC: 961.4,546.57 1514.4,719
  rectangle net 3V3: 3136.37,596.07 3188,1611.07
  rectangle net MUX1_INT: 2707.68,574.19 2738.23,599.78
  rectangle net GND: 2698.75,435 2747.97,523.01
  rectangle net 3V3: 2527.61,540.81 2577,1502.54
  rectangle net NetR5_1: 1108.47,944.09 1158.85,979.12
  rectangle net NetR5_1: 1029.68,959.09 1158.85,992.09
  rectangle net 5V_BUCK: 1001.51,1069.41 1514.49,1316.57
  rectangle net LINEOUT: 278.37,1973.19 341.41,2010.77
  rectangle net DTMF*_+: 139.4,2049.57 161.9,2170.32
  rectangle net DTMF*_-: 186.9,2049.57 212.01,2096.38
  rectangle net NetQ1_2: 176.9,2220.57 194.96,2280.72
  rectangle net LINEOUT: 231.4,2006.96 341.41,2062.07
  rectangle net DTMF*_-: 193.8,2090.17 341.24,2136.57
  rectangle net 5V: 289.71,2546.11 363.95,2589.42
  rectangle net NetF2_1: 855.95,40.48 1000.7,304.58
  rectangle net NetF2_1: 857.15,232.57 910.4,506.57
  region net GND: 3758.39,2904.06 3758.39,2909.72 3828.28,2909.72 3832,2906 3832,2870.19 3792.26,2870.19
  pour cut-out: 3950,2590.58 3950,3759.14 4311.08,3759.14 4311.08,2590.58

## Silkscreen, mask and mechanical layers (free items; w line width, h text height)
Top Overlay:
  drawing of 90 lines, arcs and shapes, not listed
  text "NO1" at 388.35,3754.88 h80 r180
  text "COM1" at 617.35,3754.88 h80 r180
  text "NC1" at 784.35,3754.88 h80 r180
  text "NO2" at 988.35,3754.88 h80 r180
  text "COM2" at 1220.35,3754.88 h80 r180
  text "NC2" at 1384.35,3754.88 h80 r180
  text "NO3" at 1588.35,3754.88 h80 r180
  text "COM3" at 1818.35,3754.88 h80 r180
  text "NC3" at 1984.35,3754.88 h80 r180
  text "TX" at 2581.35,3754.88 h80 r180
  text "RX" at 2781.35,3754.88 h80 r180
  text "GND" at 2996.35,3754.88 h80 r180
  text "B" at 3156.35,3754.88 h80 r180
  text "A" at 3355.65,3754.88 h80 r180
  text "GND" at 3594.35,3754.88 h80 r180
  text "+" at 2072.35,3688.27 h100
  text "_" at 2273.35,3688.27 h80
  text "DTMF" at 2363.15,3278.4 h120 r180
  text "RS-232" at 2897.83,3278.4 h120 r180
  text "RS-485" at 3497.89,3278.4 h120 r180
  text "#" at 3573.76,3077.03 h40 r90
  text "#" at 3615.2,2908.34 h40 r180
  text "PROGRAMMING" at 1442.4,2513.94 h80
  text "PWR" at -30.48,2488.31 h80
  text "B" at 2030.97,2378.84 h120 r90
  text "GSM" at -30.48,2361.31 h80
  text "OLED" at 954.15,2253.27 h80
  text "DTMF" at -43.48,2237.27 h80
  text "9V" at -74.4,2111.83 h40
  text "SLOT" at 2030.97,2054.92 h120 r90
  text "LINE-OUT" at -76.27,2003.27 h40
  text "5V_B" at -74.4,1892.15 h40
  text "VCC" at -76.27,1784.83 h40
  text "5V_USB" at -76.27,1673.88 h40
  text "3V3" at -76.27,1566.83 h40
  text "GSM-PWR" at -76.27,1458.02 h40
  text "5V" at -76.27,1348.83 h40
  text "GND" at -76.27,1242.83 h40
  text "A" at 2030.97,975.84 h120 r90
  text "© Netavo Global Data Services Ltd" at 799.39,916.52 h80
  text "SLOT" at 2030.97,651.92 h120 r90
  text "INPUTS" at 2108.13,304.51 h120
  text "+" at 683.22,-104.12 h100 r180
  text "_" at 884.22,-104.12 h80 r180
  text "9-30VDC" at 315.77,-169.88 h80
  text "IN1" at 1060.54,-171.73 h80
  text "IN2" at 1260.54,-171.73 h80
  text "IN3" at 1460.54,-171.73 h80
  text "IN4" at 1660.54,-171.73 h80
  text "IN5" at 1860.54,-171.73 h80
  text "IN6" at 2060.54,-171.73 h80
  text "IN7" at 2260.54,-171.73 h80
  text "IN8" at 2460.54,-171.73 h80
  text "IN9" at 2660.54,-171.73 h80
  text "IN10" at 2844.4,-171.73 h80
  text "IN11" at 3047.4,-171.73 h80
  text "IN12" at 3244.22,-171.73 h80
  text "GND" at 3442.22,-171.73 h80
Bottom Overlay:
  drawing of 124 lines, arcs and shapes, not listed
  text "RELAY-1" at 276.84,3727.77 h120 r180
  text "RELAY-2" at 876.84,3727.77 h120 r180
  text "RELAY-3" at 1476.84,3727.77 h120 r180
  text "DTMF" at 2059.02,3727.77 h120 r180
  text "RS-232" at 2524.34,3727.77 h120 r180
  text "RS-485" at 3124.28,3727.77 h120 r180
  text "ZERO CARBON FOOTPRINT" at 2116,1352 h40
  text "BaseBoard-ver2.0" at 4222,365 h50
  text "PWR" at 974.02,-145.62 h120
  text "INPUTS" at 2552.22,-145.62 h120
Dimensions:
  circle w10: c4210.39,1303.19 r98.43
  circle w10: c4210.39,2706.26 r98.43
Board_Outline:
  drawing of 221 lines, arcs and shapes, not listed
Fabrication:
  drawing of 295 lines, arcs and shapes, not listed
  text "Layer" at 5449.34,5693 h60
  text "Name" at 5859.26,5693 h60
  text "Material" at 6789,5693 h60
  text "Thickness" at 7648.77,5693 h60
  text "Constant" at 8298.6,5693 h60
  text "Board Layer Stack" at 8868.46,5693 h60
  text "Top Overlay" at 5859.26,5573 h60
  text "Top Solder" at 5859.26,5453 h60
  text "Solder Resist" at 6789,5453 h60
  text "0.010mm" at 7648.77,5453 h60
  text "3.5" at 8298.6,5453 h60
  text "1" at 5449.34,5333 h60
  text "Top Layer" at 5859.26,5333 h60
  text "0.035mm" at 7648.77,5333 h60
  text "Dielectric 2" at 5859.26,5213 h60
  text "PP-006" at 6789,5213 h60
  text "0.200mm" at 7648.77,5213 h60
  text "4.1" at 8298.6,5213 h60
  text "2" at 5449.34,5093 h60
  text "Ground" at 5859.26,5093 h60
  text "CF-004" at 6789,5093 h60
  text "0.035mm" at 7648.77,5093 h60
  text "Dielectric 1" at 5859.26,4973 h60
  text "FR-4" at 6789,4973 h60
  text "1.030mm" at 7648.77,4973 h60
  text "4.8" at 8298.6,4973 h60
  text "3" at 5449.34,4853 h60
  text "Power + Signal" at 5859.26,4853 h60
  text "CF-004" at 6789,4853 h60
  text "0.035mm" at 7648.77,4853 h60
  text "Dielectric 3" at 5859.26,4733 h60
  text "PP-006" at 6789,4733 h60
  text "0.200mm" at 7648.77,4733 h60
  text "4.1" at 8298.6,4733 h60
  text "4" at 5449.34,4613 h60
  text "Bottom Layer" at 5859.26,4613 h60
  text "0.035mm" at 7648.77,4613 h60
  text "Bottom Solder" at 5859.26,4493 h60
  text "Solder Resist" at 6789,4493 h60
  text "0.010mm" at 7648.77,4493 h60
  text "3.5" at 8298.6,4493 h60
  text "Bottom Overlay" at 5859.26,4373 h60
  text "Total board thickness:" at 5449.34,4253 h60
  text "1.590mm" at 7648.77,4253 h60
Drill Drawing:
  drawing of 165 lines, arcs and shapes, not listed
  text "Symbol" at -128.5,8555.94 h72
  text "Count" at 377.38,8555.94 h72
  text "Hole Size" at 977.22,8555.94 h72
  text "Plated" at 2126.88,8555.94 h72
  text "Hole Type" at 2632.76,8555.94 h72
  text "Drill Layer Pair" at 3366.56,8555.94 h72
  text "Via/Pad" at 4866.11,8555.94 h72
  text "Pad Shape" at 5455.96,8555.94 h72
  text "Template" at 6201.76,8555.94 h72
  text "Description" at 7341.42,8555.94 h72
  text "Hole Tolerance (+)" at 8195.19,8555.94 h72
  text "Hole Tolerance (-)" at 9528.79,8555.94 h72
  text "1" at 377.38,8405.94 h60
  text "55.12mil (1.400mm)" at 977.22,8405.94 h60
  text "PTH" at 2126.88,8405.94 h60
  text "Round" at 2632.76,8405.94 h60
  text "Top Layer - Bottom Layer" at 3366.56,8405.94 h60
  text "Pad" at 4866.11,8405.94 h60
  text "Rounded" at 5455.96,8405.94 h60
  text "c250h140" at 6201.76,8405.94 h60
  text "2" at 377.38,8255.94 h60
  text "23.62mil (0.600mm)" at 977.22,8255.94 h60
  text "PTH" at 2126.88,8255.94 h60
  text "Slot" at 2632.76,8255.94 h60
  text "Top Layer - Bottom Layer" at 3366.56,8255.94 h60
  text "Pad" at 4866.11,8255.94 h60
  text "Rounded" at 5455.96,8255.94 h60
  text "r90_170h60_140r100" at 6201.76,8255.94 h60
  text "2" at 377.38,8105.94 h60
  text "23.62mil (0.600mm)" at 977.22,8105.94 h60
  text "PTH" at 2126.88,8105.94 h60
  text "Slot" at 2632.76,8105.94 h60
  text "Top Layer - Bottom Layer" at 3366.56,8105.94 h60
  text "Pad" at 4866.11,8105.94 h60
  text "Rounded" at 5455.96,8105.94 h60
  text "(Mixed)" at 6201.76,8105.94 h60
  text "2" at 377.38,7955.94 h60
  text "24.41mil (0.620mm)" at 977.22,7955.94 h60
  text "NPTH" at 2126.88,7955.94 h60
  text "Round" at 2632.76,7955.94 h60
  text "Top Layer - Bottom Layer" at 3366.56,7955.94 h60
  text "Pad" at 4866.11,7955.94 h60
  text "Rounded" at 5455.96,7955.94 h60
  text "c0hn62" at 6201.76,7955.94 h60
  text "2" at 377.38,7805.94 h60
  text "41.34mil (1.050mm)" at 977.22,7805.94 h60
  text "PTH" at 2126.88,7805.94 h60
  text "Round" at 2632.76,7805.94 h60
  text "Top Layer - Bottom Layer" at 3366.56,7805.94 h60
  text "Pad" at 4866.11,7805.94 h60
  text "Rounded" at 5455.96,7805.94 h60
  text "c180h105" at 6201.76,7805.94 h60
  text "2" at 377.38,7655.94 h60
  text "43.31mil (1.100mm)" at 977.22,7655.94 h60
  text "NPTH" at 2126.88,7655.94 h60
  text "Round" at 2632.76,7655.94 h60
  text "Top Layer - Bottom Layer" at 3366.56,7655.94 h60
  text "Pad" at 4866.11,7655.94 h60
  text "Rectangle" at 5455.96,7655.94 h60
  text "s0hn110" at 6201.76,7655.94 h60
  text "2" at 377.38,7505.94 h60
  text "43.31mil (1.100mm)" at 977.22,7505.94 h60
  text "PTH" at 2126.88,7505.94 h60
  text "Round" at 2632.76,7505.94 h60
  text "Top Layer - Bottom Layer" at 3366.56,7505.94 h60
  text "Pad" at 4866.11,7505.94 h60
  text "Rounded" at 5455.96,7505.94 h60
  text "c180h110" at 6201.76,7505.94 h60
  text "2" at 377.38,7355.94 h60
  text "51.18mil (1.300mm)" at 977.22,7355.94 h60
  text "PTH" at 2126.88,7355.94 h60
  text "Round" at 2632.76,7355.94 h60
  text "Top Layer - Bottom Layer" at 3366.56,7355.94 h60
  text "Pad" at 4866.11,7355.94 h60
  text "Rounded" at 5455.96,7355.94 h60
  text "c210h130" at 6201.76,7355.94 h60
  text "2" at 377.38,7205.94 h60
  text "62.99mil (1.600mm)" at 977.22,7205.94 h60
  text "NPTH" at 2126.88,7205.94 h60
  text "Round" at 2632.76,7205.94 h60
  text "Top Layer - Bottom Layer" at 3366.56,7205.94 h60
  text "Pad" at 4866.11,7205.94 h60
  text "Rectangle" at 5455.96,7205.94 h60
  text "s0hn160" at 6201.76,7205.94 h60
  text "4" at 377.38,7055.94 h60
  text "59.06mil (1.500mm)" at 977.22,7055.94 h60
  text "PTH" at 2126.88,7055.94 h60
  text "Round" at 2632.76,7055.94 h60
  text "Top Layer - Bottom Layer" at 3366.56,7055.94 h60
  text "Pad" at 4866.11,7055.94 h60
  text "Rounded" at 5455.96,7055.94 h60
  text "c250h150" at 6201.76,7055.94 h60
  text "4" at 377.38,6905.94 h60
  text "200.79mil (5.100mm)" at 977.22,6905.94 h60
  text "NPTH" at 2126.88,6905.94 h60
  text "Round" at 2632.76,6905.94 h60
  text "Top Layer - Bottom Layer" at 3366.56,6905.94 h60
  text "Pad" at 4866.11,6905.94 h60
  text "Rounded" at 5455.96,6905.94 h60
  text "c0hn510" at 6201.76,6905.94 h60
  text "5" at 377.38,6755.94 h60
  text "118.11mil (3.000mm)" at 977.22,6755.94 h60
  text "NPTH" at 2126.88,6755.94 h60
  text "Round" at 2632.76,6755.94 h60
  text "Top Layer - Bottom Layer" at 3366.56,6755.94 h60
  text "Pad" at 4866.11,6755.94 h60
  text "Rounded" at 5455.96,6755.94 h60
  text "c0hn300" at 6201.76,6755.94 h60
  text "A" at -157.59,6745.95 h66.67
  text "15" at 377.38,6605.94 h60
  text "40.16mil (1.020mm)" at 977.22,6605.94 h60
  text "PTH" at 2126.88,6605.94 h60
  text "Round" at 2632.76,6605.94 h60
  text "Top Layer - Bottom Layer" at 3366.56,6605.94 h60
  text "Pad" at 4866.11,6605.94 h60
  text "(Mixed)" at 5455.96,6605.94 h60
  text "(Mixed)" at 6201.76,6605.94 h60
  text "32" at 377.38,6455.94 h60
  text "62.99mil (1.600mm)" at 977.22,6455.94 h60
  text "PTH" at 2126.88,6455.94 h60
  text "Round" at 2632.76,6455.94 h60
  text "Top Layer - Bottom Layer" at 3366.56,6455.94 h60
  text "Pad" at 4866.11,6455.94 h60
  text "(Mixed)" at 5455.96,6455.94 h60
  text "(Mixed)" at 6201.76,6455.94 h60
  text "449" at 377.38,6305.94 h60
  text "11.81mil (0.300mm)" at 977.22,6305.94 h60
  text "PTH" at 2126.88,6305.94 h60
  text "Round" at 2632.76,6305.94 h60
  text "Top Layer - Bottom Layer" at 3366.56,6305.94 h60
  text "Via" at 4866.11,6305.94 h60
  text "Rounded" at 5455.96,6305.94 h60
  text "v60h30" at 6201.76,6305.94 h60
  text "526 Total" at 377.38,6155.94 h60
  text "Slot definitions :" at -128.5,6010.97 h60
  text "Routed Path Length" at 904.19,6010.97 h60
  text "= Calculated from tool start centre position to tool end centre position." at 2006.86,6010.97 h60
  text "Hole Length" at 904.19,5910.99 h60
  text "= Routed Path Length + Tool Size = Slot length as defined in the PCB layout" at 1596.99,5910.99 h60

## Dimensions
4311.08,-177.86 to 4311.08,492.88 on Dimensions
4311.08,492.88 to 4035.55,1185.58 on Dimensions
4035.55,1185.58 to 4311.08,1421.79 on Dimensions
4311.08,1896.88 to 4311.08,1421.79 on Dimensions
4035.55,2590.58 to 4311.08,1896.88 on Dimensions
4311.08,2826.8 to 4035.55,2590.58 on Dimensions
4311.08,3759.14 to 4311.08,2826.8 on Dimensions
-177.11,-177.86 to -177.11,3759.14 on Dimensions
-177.11,3759.14 to 4311.08,3759.14 on Dimensions

## Text inside footprints (layer, text, board x,y; h text height)
2: Top Overlay "1" at 656.47,2676.09 h31.5 r90
J3: Top Overlay "Board Edge" at -120.75,589.83 h28 r270
J12: Top Overlay "18" at 1251.21,2482.09 h19.68; Top Overlay "2" at 885.21,2472.09 h19.68; Top Overlay "17" at 1231.21,2376.09 h19.68; Top Overlay "1" at 873.21,2382.09 h19.68
J19: Top Overlay "PCB EDGE" at 3770.17,3710.42 h11.81
J20: Top Overlay "1" at 2131.72,1588.14 h31.5 r270; Top Overlay "2" at 2339.72,1572.17 h31.5 r270; Top Overlay "52" at 2341.07,665.14 h31.5 r270; Top Overlay "51" at 2130.08,681.14 h31.5 r270
J21: Top Overlay "1" at 2131.72,2991.14 h31.5 r270; Top Overlay "2" at 2339.72,2975.17 h31.5 r270; Top Overlay "52" at 2341.07,2068.14 h31.5 r270; Top Overlay "51" at 2130.07,2084.14 h31.5 r270
K2: Top Overlay "1" at 1254.21,2676.09 h31.5 r90
K3: Top Overlay "1" at 1850.21,2676.09 h31.5 r90
SW1: Top Overlay "PCB Edge" at -38.73,1065.98 h39.37 r270